# Altium PCB Baseboard-Development.PcbDoc (part 7 of 8)
Units mm, origin at the board's own origin, x right, y up, seen from the top; angles counter-clockwise.
Board outline 120 x 90 mm, 6 copper layers (Top Layer, SIGNAL-1, PWR, SIGNAL-2, GND-2, Bottom Layer), stack 1.705 mm thick; 417 components, 313 nets, 1500 pads, 606 vias.
Unrouted connection lines stored in the file: 357.
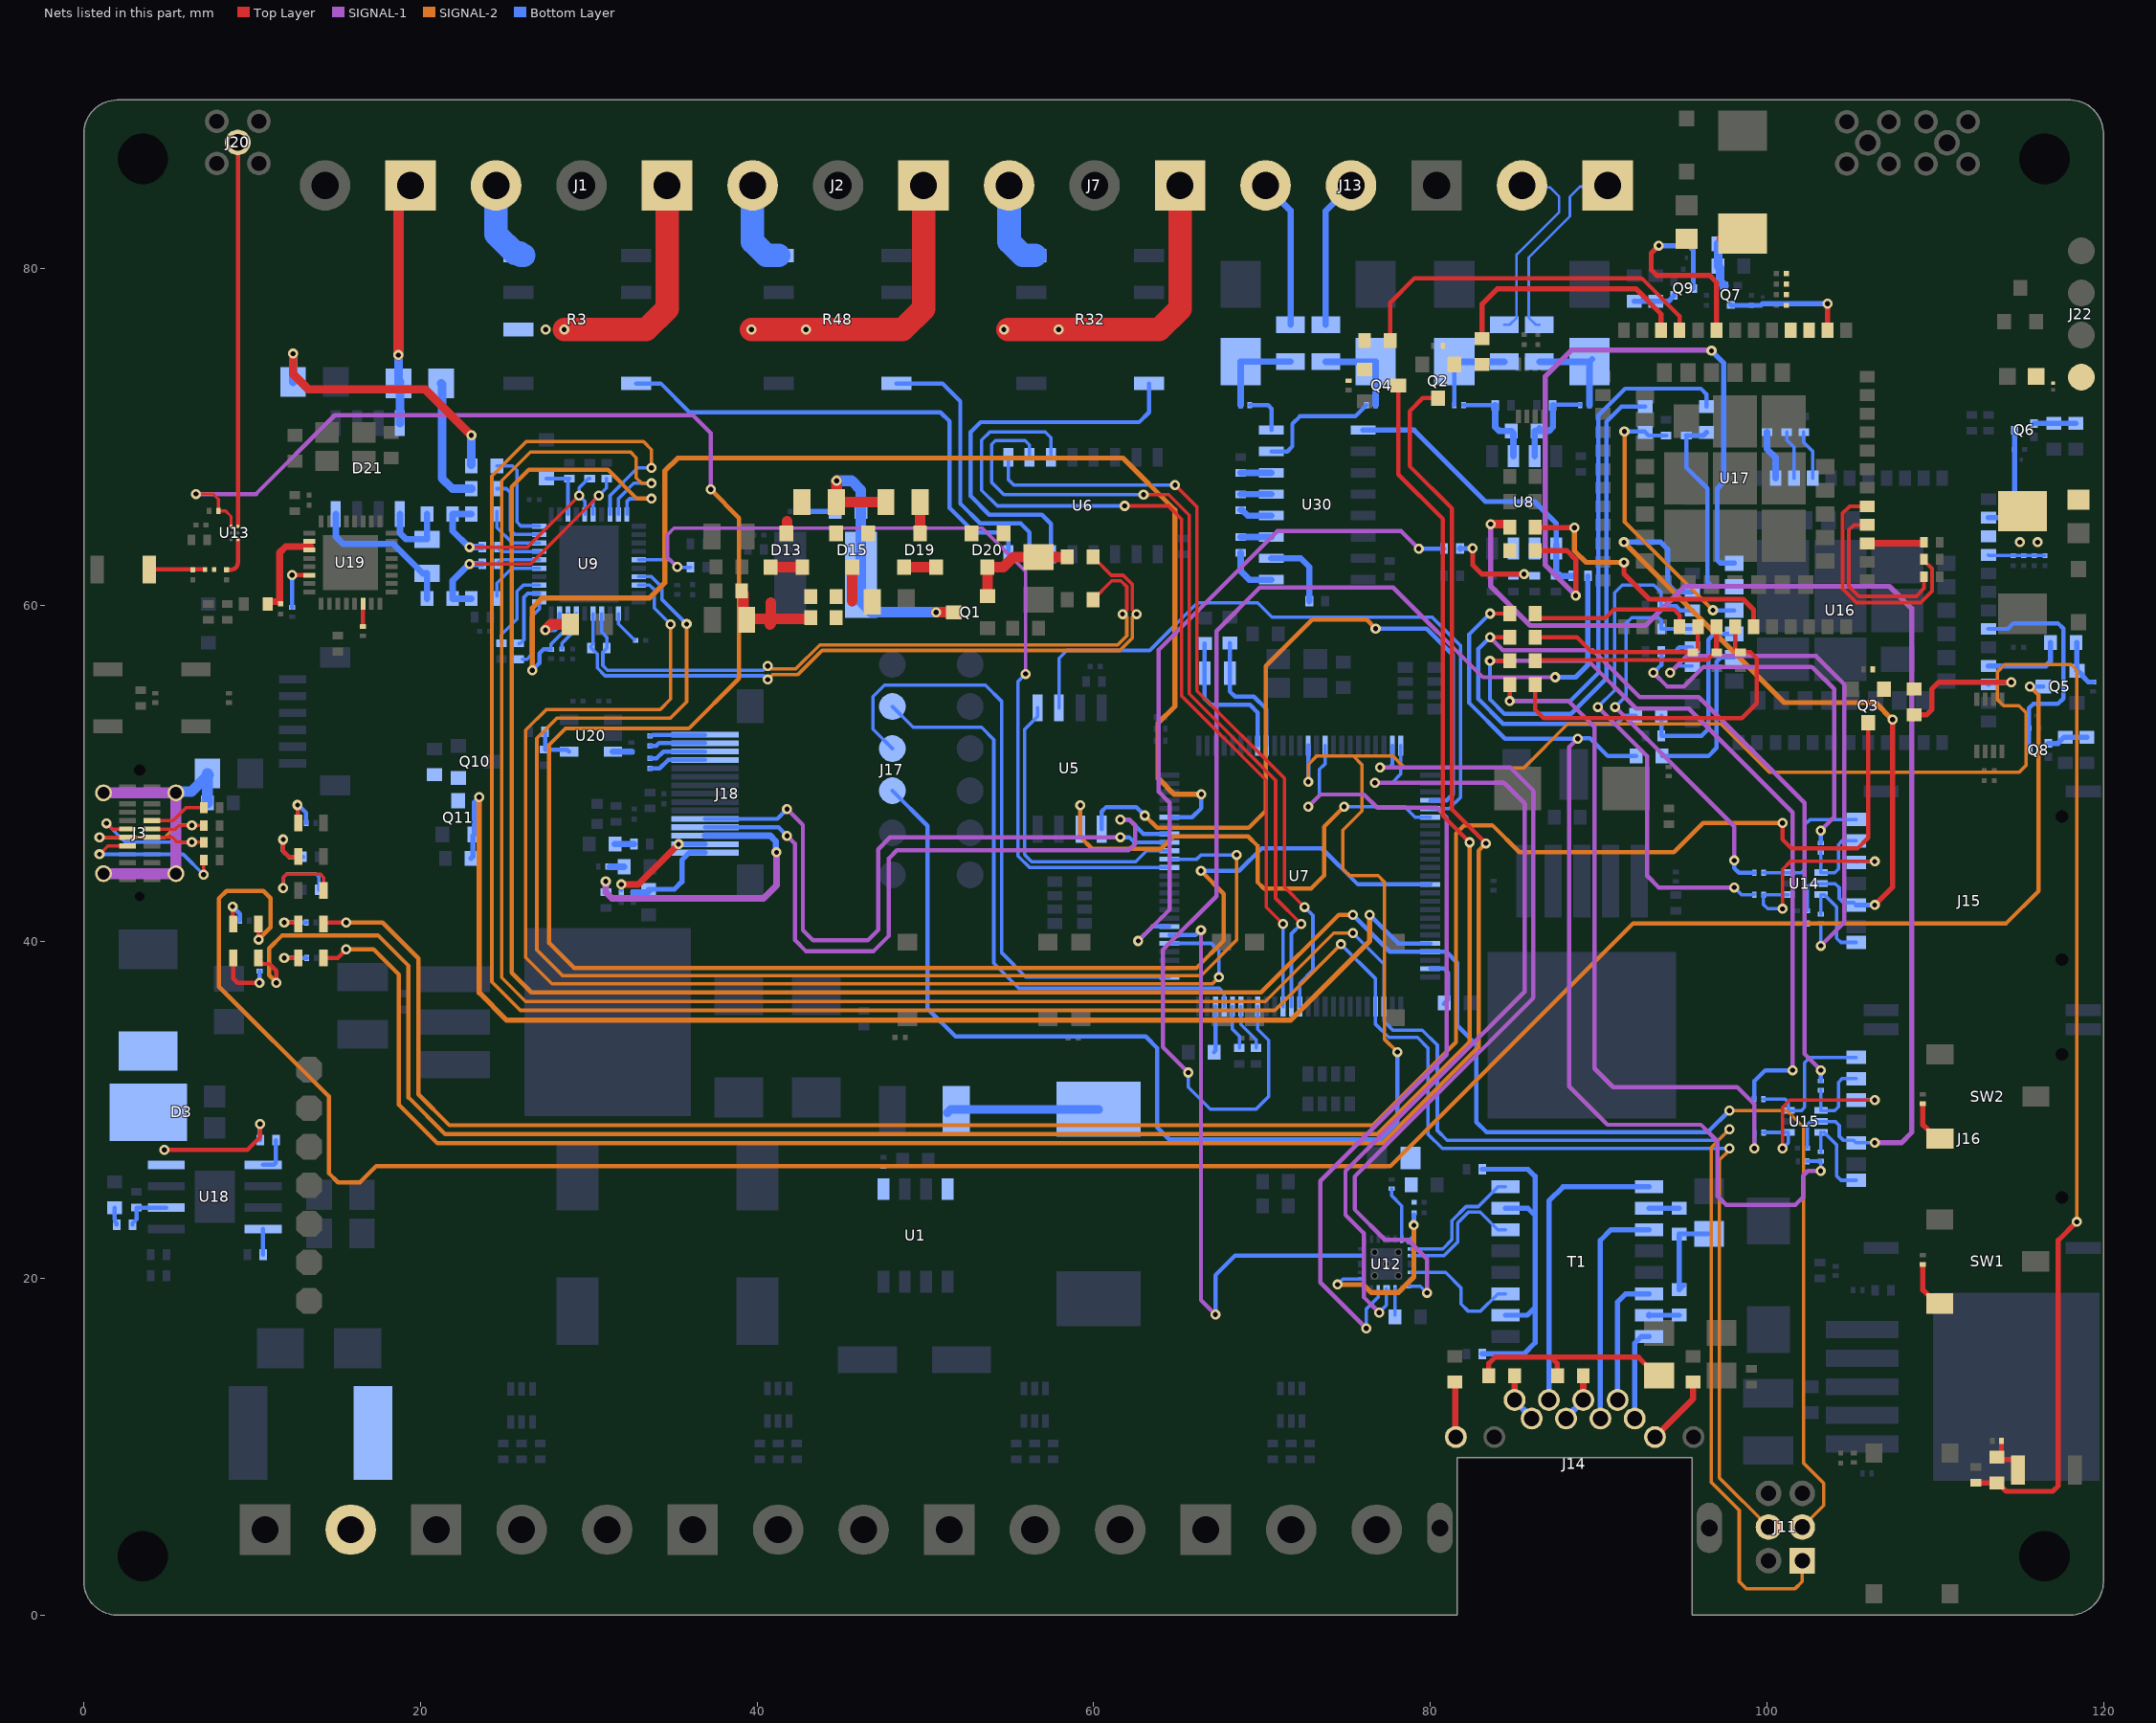
[diagram p8: the nets of this part, all layers, seen from the top]

## Via types
v1: diameter 0.6, hole 0.3, Top Layer to Bottom Layer, tented both sides, 606 vias

## Nets (pads, with @x,y where several pads share a name; then routed paths per layer and width w, separated by ;. In a path a pad name is that pad's centre, name@x,y a point inside that pad or via, vN(x,y) a via of type N, cw(c..) or ccw(c..) an arc to the next point about the centre after c; other vN are vias at no path point) (continued)
MDC: U7.16 U12.16 | length 50.2
  SIGNAL-1 w0.254: v1(72.749,48.013) 73.48,48.744 76.063,48.744 76.848,47.959 80.394,47.959 80.975,47.378 80.975,33.289 73.47,25.784 73.47,19.763 v1(76.195,17.038)
  Bottom Layer w0.203: v1(72.749,48.013) 73.421,48.685 73.421,50.237 73.749,50.565 U7.16@73.749,51.651 ; v1(76.195,17.038) 76.195,18.182 76.898,18.885 U12.16@76.898,19.256
MDIO: U7.25 U12.15 | length 49.9
  SIGNAL-1 w0.254: v1(76.709,49.442) 84.387,49.442 85.605,48.224 85.605,37.03 74.961,26.387 74.961,23.769 76.043,22.687 76.043,18.891 v1(76.96,17.975)
  Bottom Layer w0.203: v1(76.709,49.442) 77.725,49.442 78.249,49.966 U7.25@78.249,51.651 ; v1(76.96,17.975) 77.4,18.414 U12.15@77.4,19.38
NC_1: J1.1 R3.2 | length 13.9
  Top Layer w1.397: v1(28.544,76.362) 33.418,76.362 34.655,77.598 J1.1@34.655,84.92
  other v1: 27.441,76.362
NC_2: J2.1 R48.2 | length 18.1
  Top Layer w1.397: v1(39.664,76.362) v1(42.915,76.362) 48.658,76.362 49.895,77.598 J2.1@49.895,84.92
NC_3: J7.1 R32.2 | length 18.1
  Top Layer w1.397: v1@54.904,76.362 58.155,76.362 63.898,76.362 65.135,77.598 J7.1@65.135,84.92
  other v1: 54.669,76.362 57.921,76.362
NetANT1_1: ANT1.1 C107.2 L4.1 | length 3.3
  Top Layer w0.257: ANT1.1@3.881,62.098 3.881,62.109 L4.1@7.197,62.109
NetC3_2: C3.2 J18.14 | length 6.4
  Top Layer w0.381: v1(31.935,43.404) 32.944,43.404 34.245,44.705 v1(35.334,45.793)
  Bottom Layer w0.254: C3.2@31.935,43.064 v1(31.935,43.404) v1@31.935,43.531
  Bottom Layer w0.305: v1(35.334,45.793) J18.14@36.91,45.793
NetC4_2: C4.2 C5.2 J18.15 | length 6
  Bottom Layer w0.305: C4.2@33.561,43.114 35.091,43.114 35.537,43.561 35.537,44.847 35.984,45.293 J18.15@36.91,45.293
  Bottom Layer w0.381: C5.2@32.647,42.932 33.506,42.932 C4.2@33.625,43.051
NetC6_1: C6.1 J18.1 | length 3.3
  Bottom Layer w0.254: C6.1@33.637,52.23 33.66,52.253 33.771,52.253 33.809,52.29 J18.1@36.907,52.29
NetC6_2: C6.2 J18.2 | length 3.3
  Bottom Layer w0.254: C6.2@33.637,51.63 34.005,51.63 34.168,51.793 J18.2@36.91,51.793
NetC7_1: C7.1 J18.3 | length 3.4
  Bottom Layer w0.254: C7.1@33.637,50.885 34.028,50.885 34.436,51.293 J18.3@36.91,51.293
NetC7_2: C7.2 J18.4 | length 3.5
  Bottom Layer w0.254: C7.2@33.637,50.285 34.208,50.285 34.716,50.793 J18.4@36.91,50.793
NetC8_2: C8.2 J3.MP1 J3.MP2 J3.MP3 J3.MP4 R5.2 | length 17.5
  SIGNAL-1 w0.635: J3.MP3@1.172,44.042 J3.MP2@5.472,44.042 ; J3.MP4@1.172,48.842 J3.MP1@5.472,48.842 5.472,44.098 J3.MP2@5.481,44.089
  Bottom Layer w0.635: J3.MP1@5.472,48.842 5.542,48.912 6.389,48.912 C8.2@7.348,49.871 ; R5.2@7.348,48.237 C8.2@7.348,49.871 ; C8.2@7.348,49.998 C8.2@7.348,49.871 ; C8.2@7.412,49.906 7.383,49.906 C8.2@7.348,49.871
NetC17_1: C17.1 D3.2 L1.1 U18.8 | length 7.7
  Top Layer w0.254: v1(4.78,27.635) 9.722,27.635 10.477,28.391 v1(10.477,29.168)
  Bottom Layer w0.254: C17.1@10.477,28.216 v1(10.477,29.168)
NetC17_2: C17.2 U18.1 | length 2.2
  Bottom Layer w0.254: U18.1@10.655,26.746 11.294,26.746 11.417,26.869 C17.2@11.417,28.216
NetC21_2: C21.2 R8.2 U18.6 | length 2.9
  Bottom Layer w0.254: R8.2@2.895,23.186 2.895,23.275 3.124,23.504 C21.2@3.124,24.206 U18.6@4.905,24.206
NetC22_2: C22.2 R8.1 | length 1.1
  Bottom Layer w0.254: C22.2@1.829,24.206 1.829,23.525 1.854,23.5 1.854,23.377 1.956,23.275 R8.1@1.956,23.186
NetC25_2: C25.2 U7.49 | length 3.1
  Bottom Layer w0.254: U7.49@79.999,38.401 80.813,38.401 81.056,38.159 81.056,36.559 C25.2@80.81,36.313
NetC26_2: C26.2 U7.73 | length 2.8
  Bottom Layer w0.254: C26.2@67.147,33.437 67.249,33.538 U7.73@67.249,36.151
NetC42_1: C42.1 U30.4 | length 2
  Bottom Layer w0.381: C42.1@68.731,65.641 68.82,65.641 69.15,65.311 U30.4@70.559,65.311
NetC42_2: C42.2 U30.5 | length 1.8
  Bottom Layer w0.381: C42.2@68.731,66.581 U30.5@70.559,66.581
NetC43_1: C43.1 U30.1 | length 3.1
  Bottom Layer w0.381: C43.1@68.731,63.101 68.731,62.011 69.241,61.501 U30.1@70.559,61.501
NetC43_2: C43.2 U30.3 | length 1.8
  Bottom Layer w0.381: C43.2@68.731,64.041 U30.3@70.559,64.041
NetC44_2: C44.2 U30.6 | length 1.8
  Bottom Layer w0.381: C44.2@68.731,67.851 U30.6@70.559,67.851
NetC45_2: C45.2 U30.2 | length 4.5
  Bottom Layer w0.381: U30.2@70.559,62.771 72.306,62.771 72.814,62.263 C45.2@72.814,60.231
NetC49_2: C49.2 C76.2 C77.2 FB2.1 U12.6 U12.19 | length 11.5
  SIGNAL-2 w0.305: v1(74.493,19.636) 76.015,19.636 76.497,19.155 78.097,19.155 79.025,20.082 v1(79.025,23.16)
  Bottom Layer w0.203: v1(74.493,19.636) 74.811,19.955 U12.19@75.925,19.955
  Bottom Layer w0.305: U12.6@78.725,22.18 79.025,22.48 v1(79.025,23.16) C76.2@79.025,23.761
NetC53_1: C53.1 R29.2 | length 2.1
  Bottom Layer w0.305: C53.1@42.571,65.556 R29.2@44.647,65.556
NetC54_1: C54.1 D12.2 U9.33 | length 3.5
  Bottom Layer w0.203: D12.2@27.484,67.507 28.765,67.507 C54.1@28.857,67.507 28.765,67.415 U9.33@28.765,65.383
NetC55_1: C55.1 C56.1 C64.2 D15.3 D19.1 D19.2 | length 3.9
  Top Layer w0.635: 45.658,60.244 D15.3@45.658,62.251 ; D19.1@48.737,62.251 D19.2@50.637,62.251
NetC55_2: C55.2 C56.2 C58.2 D13.1 D13.2 R28.1 | length 9
  Top Layer w0.635: R28.1@39.086,60.842 39.086,60.779 39.193,60.671 39.193,59.312 C58.2@39.384,59.122 39.446,59.184 C56.2@43.122,59.184 ; 40.76,58.829 40.822,58.891 40.822,60.136 ; D13.1@40.797,62.251 D13.2@42.697,62.251 42.697,62.201 D13.2@42.789,62.109
NetC57_1: C57.1 C59.1 L3.1 Q1.3 R29.1 | length 18.3
  Top Layer w0.635: C57.1@44.708,66.122 44.724,66.137 v1(44.724,67.381) ; C57.1@44.708,66.122 C59.1@47.655,66.121 ; v1(50.637,59.567) Q1.3@51.69,59.567
  Bottom Layer w0.635: v1(44.724,67.381) 45.613,67.381 46.171,66.823 R29.1@46.171,65.556 L3.1@46.171,61.796 46.171,60.199 46.803,59.567 v1(50.637,59.567)
NetC57_2: C57.2 D13.3 D15.1 D15.2 | length 0.7
  Top Layer w0.635: D13.3@41.747,64.251 41.784,64.289 41.784,64.975
NetC59_2: C59.2 D19.3 D20.1 D20.2 | length 1.9
  Top Layer w0.635: D19.3@49.687,64.251 C59.2@49.687,66.121
NetC60_2: C60.2 U9.26 | length 2.6
  Bottom Layer w0.203: C60.2@24.613,62.412 24.613,62.501 24.795,62.683 U9.26@27.065,62.683
NetC61_2: C61.2 U9.27 | length 2.6
  Bottom Layer w0.203: C61.2@24.613,63.455 24.613,63.366 24.795,63.183 U9.27@27.065,63.183
NetC65_1: C65.1 U9.21 | length 4
  Bottom Layer w0.203: C65.1@26.043,56.775 26.044,56.776 26.343,56.776 26.581,57.014 26.581,59.286 27.065,59.771 U9.21@27.065,60.183
NetC65_2: C65.2 U9.22 | length 3.9
  Bottom Layer w0.203: C65.2@25.839,57.714 25.928,57.714 26.152,57.938 26.152,60.461 26.375,60.683 U9.22@27.065,60.683
NetC66_2: C66.2 U9.12 | length 2
  Bottom Layer w0.203: U9.12@31.765,59.483 31.766,59.482 31.766,58.885 32.71,57.941 32.742,57.941 C66.2@32.742,57.928
NetC68_2: C68.2 U9.17 | length 2.4
  Bottom Layer w0.203: C68.2@28.415,57.39 28.415,57.725 29.265,58.575 U9.17@29.265,59.483
NetC69_1: C69.1 D21.5 R67.1 | length 4.4
  Bottom Layer w0.381: D21.5@18.785,65.405 18.785,64.271 19.15,63.906 C69.1@20.391,63.906 R67.1@20.391,65.405
NetC69_2: C69.2 D21.8 R66.1 | length 9.2
  Bottom Layer w0.381: D21.8@14.975,65.405 14.976,65.404 14.976,64.058 15.41,63.624 18.388,63.624 20.137,61.874 C69.2@20.391,61.874 R66.1@20.391,60.376
NetC78_2: C78.2 C79.2 T1.2 T1.7 | length 20.5
  Bottom Layer w0.305: C78.2@83.087,15.519 85.569,15.519 86.228,16.178 86.228,18.283 ; C79.2@83.087,26.487 85.805,26.487 86.228,26.064 86.228,23.744 ; T1.2@84.466,17.817 85.762,17.817 86.228,18.283 ; T1.7@84.466,24.167 85.805,24.167 86.228,23.744 ; 86.228,18.283 86.228,23.744
NetC90_2: C90.2 C91.2 C92.2 C93.2 C94.1 FB4.1 U17.34 U17.35 | length 1
  Top Layer w0.508: C94.1@97.289,81.777 97.855,82.344 97.855,82.216 C94.1@97.904,82.168
NetC95_2: C95.2 C96.2 C97.2 C98.2 C99.1 FB3.1 U16.34 U16.35 | length 3.4
  Bottom Layer w0.203: U16.35@113.164,62.981 113.211,62.934 C95.2@114.626,62.934 C96.2@115.257,62.934 C97.2@115.887,62.934 C98.2@116.518,62.934
  other v1: 115.028,63.731 116.09,63.731
NetC108_2: C108.2 L4.2 U13.A3 | length 2.3
  Top Layer w0.257: C108.2@8.477,62.098 8.736,62.098 ccw(c8.736,62.513) 9.152,62.513 U13.A3@9.152,63.874
NetC109_2: C109.2 R88.1 R89.1 | length 5.4
  Bottom Layer w0.305: R88.1@95.046,19.594 R88.1@94.793,19.341 R89.1@94.793,22.643 C109.2@96.571,22.643
NetC113_2: C113.2 SB4.1 U17.15 | length 11.4
  Top Layer w0.254: SB4.1@86.241,58.085 88.716,58.085 89.613,57.189 C113.2@95.608,57.189 95.697,57.189 95.908,57.399 U17.15@95.908,58.712
NetC115_2: C115.2 SB6.1 U17.17 | length 20.7
  Top Layer w0.254: SB6.1@86.241,55.275 86.241,53.779 86.744,53.276 98.511,53.276 99.401,54.166 99.401,56.823 99.036,57.189 98.339,57.189 98.108,57.42 U17.17@98.108,58.712
NetC118_2: C118.2 SB8.1 U17.16 | length 12.5
  Top Layer w0.254: SB8.1@86.241,56.68 86.292,56.731 96.468,56.731 96.925,57.189 C118.2@97.014,57.189
  Top Layer w0.305: U17.16@97.008,58.712 97.011,58.709 97.011,57.191 C118.2@97.014,57.189
NetC119_2: C119.2 SB15.1 U16.54 | length 16.6
  SIGNAL-2 w0.254: v1(91.536,70.302) 91.536,64.945 v1(96.794,59.688)
  Bottom Layer w0.254: v1(91.536,70.302) 92.734,70.302 92.97,70.066 C119.2@94.009,70.066 ; v1(96.794,59.688) 98.058,59.688 U16.54@98.064,59.681
NetC120_2: C120.2 SB13.1 U16.55 | length 12.2
  Bottom Layer w0.254: C120.2@95.219,70.066 95.219,68.162 96.461,66.921 96.461,61.373 96.753,61.081 U16.55@98.064,61.081
  Bottom Layer w0.305: C120.2@95.219,70.066 96.226,70.066 SB13.1@96.416,70.256
NetC121_2: C121.2 SB11.1 U16.53 | length 11.2
  Bottom Layer w0.254: SB11.1@93.725,53.431 C121.2@93.725,52.231 96.115,52.231 96.519,52.635 96.519,57.945 96.855,58.281 U16.53@98.064,58.281
NetC126_1: C126.1 L5.1 U19.2 U19.3 | length 5.3
  Top Layer w0.406: 11.227,60.191 11.563,60.191 11.635,60.263 11.635,63.111 11.987,63.464 13.392,63.464 13.491,63.464
NetC132_2: C132.2 R86.1 R87.1 | length 12.7
  Top Layer w0.305: R86.1@83.484,14.224 83.484,14.958 83.852,15.325 87.162,15.325 ; R87.1@87.564,14.224 87.54,14.248 87.54,14.947 87.162,15.325 ; C132.2@93.599,14.224 93.472,14.224 92.37,15.325 87.162,15.325
NetD7_1: D7.1 L2.1 U1.8 | length 9
  Bottom Layer w0.508: D7.1@51.316,29.85 51.488,30.023 51.514,30.048 L2.1@60.282,30.048
NetD14_2: D14.2 F3.2 J22.1
NetD20_3: D20.3 Q1.2 R57.2 R60.2 | length 6.7
  Top Layer w0.635: Q1.2@53.69,60.517 D20.3@53.69,62.251 ; D20.3@53.69,62.251 54.64,62.251 55.239,62.851 R57.2@58.436,62.851
NetD40_2: D40.2 F20.1 R74.2 | length 5.8
  Bottom Layer w0.381: F20.1@86.485,74.447 89.39,74.447 D40.2@89.441,74.397 ; R74.2@89.457,71.864 89.457,74.438 D40.2@89.619,74.6
NetD41_2: D41.2 F21.1 R75.2 | length 5.6
  Bottom Layer w0.254: R75.2@81.431,71.864 81.431,74.447 D41.2@81.431,74.452
  Bottom Layer w0.381: D41.2@81.431,74.447 F21.1@84.402,74.447
NetD42_2: D42.2 F19.2 R73.1 | length 5.6
  Bottom Layer w0.381: R73.1@68.731,71.864 D42.2@68.731,74.452 F19.2@71.702,74.452
NetD43_2: D43.2 F22.2 R76.1 | length 5.6
  Bottom Layer w0.381: F22.2@73.785,74.447 76.752,74.447 D43.2@76.757,74.452 R76.1@76.757,71.864
NetF2_1: F2.1 J5.2
NetJ3_A5: J3.A5 R4.1 | length 3.4
  Top Layer w0.203: J3.A5@4.042,47.192 5.307,47.192 6.081,47.966 R4.1@7.12,47.966
NetJ3_A6: J3.A6 J3.B6 R64.2 | length 10.6
  Top Layer w0.203: v1@0.94,46.192 J3.B6@2.602,46.192 ; J3.A6@4.042,46.692 5.443,46.692 5.659,46.909 v1(6.421,46.909) 7.031,46.909 R64.2@7.081,46.858
  SIGNAL-2 w0.203: v1@0.96,46.197 4.821,46.197 5.532,46.909 v1(6.421,46.909)
  other v1: 0.935,46.197
NetJ3_A7: J3.A7 J3.B7 R63.2 | length 10.1
  Top Layer w0.203: v1(1.341,47.036) 1.684,46.692 J3.B7@2.602,46.692 ; J3.A7@4.042,46.192 5.268,46.192 5.542,45.918 v1(6.421,45.918) 6.425,45.914 7.105,45.914 R63.2@7.12,45.9
  Bottom Layer w0.203: v1(1.341,47.036) 2.459,45.918 v1(6.421,45.918)
NetJ3_B5: J3.B5 R6.1 | length 9.4
  Top Layer w0.203: v1(0.935,45.192) 1.435,45.692 J3.B5@2.602,45.692 ; v1(7.12,43.978) R6.1@7.12,44.842
  Bottom Layer w0.203: v1(0.935,45.192) 5.906,45.192 v1(7.12,43.978)
NetJ14_1: J14.1 T1.16 | length 5.5
  Bottom Layer w0.305: J14.1@92.148,11.682 92.148,16.154 92.541,16.547 T1.16@92.996,16.547
NetJ14_2: J14.2 T1.14 | length 7.9
  Bottom Layer w0.305: J14.2@91.128,12.782 91.128,18.604 91.612,19.087 T1.14@92.996,19.087
NetJ14_3: J14.3 T1.11 | length 13.7
  Bottom Layer w0.305: J14.3@90.108,11.682 90.108,22.263 90.742,22.897 T1.11@92.996,22.897
NetJ14_4: J14.4 J14.5 R87.2 | length 3
  Top Layer w0.381: J14.4@89.088,12.782 R87.2@89.088,14.224
  Bottom Layer w0.381: J14.5@88.068,11.682 88.068,11.722 89.088,12.742 J14.4@89.088,12.782
NetJ14_6: J14.6 T1.9 | length 18.1
  Bottom Layer w0.305: J14.6@87.048,12.782 87.048,24.601 87.885,25.437 T1.9@92.996,25.437
NetJ14_7: J14.7 J14.8 R86.2 | length 3
  Top Layer w0.381: J14.8@85.008,12.782 R86.2@85.008,14.224
  Bottom Layer w0.381: J14.8@85.008,12.782 85.008,12.742 86.028,11.722 J14.7@86.028,11.682
NetJ14_10: J14.10 R84.2 | length 4.2
  Top Layer w0.381: J14.10@93.348,10.582 95.613,12.846 R84.2@95.613,13.843
NetJ14_12: J14.12 R85.2 | length 3.3
  Top Layer w0.381: R85.2@81.467,13.843 81.492,13.817 81.492,10.608 J14.12@81.518,10.582
NetJ18_13: J18.13 R121.2 | length 18.9
  SIGNAL-1 w0.381: v1(31.01,43.581) 31.01,42.938 31.373,42.576 40.391,42.576 41.156,43.341 v1(41.156,45.308)
  Bottom Layer w0.254: v1(31.01,43.581) 31.016,43.576 31.016,42.957 R121.2@31.021,42.952
  Bottom Layer w0.381: J18.13@36.91,46.293 40.786,46.293 41.115,45.965 41.115,45.35 v1(41.156,45.308)
NetJ20_1: J20.1 U13.A1 | length 22.8
  Top Layer w0.257: U13.A1@9.152,64.674 J20.1@9.152,87.478
NetLED1_1: LED1.1 R10.2 | length 2.4
  Top Layer w0.254: v1(12.699,48.119) 12.722,48.097 12.722,47.083 LED1.1@12.745,47.06
  Bottom Layer w0.254: v1(12.699,48.119) 12.745,48.119 13.212,47.652 13.212,47.068 R10.2@13.22,47.06
NetLED4_1: LED4.1 R100.1 | length 2.1
  Top Layer w0.254: v1(8.842,42.085) 8.842,41.083 LED4.1@8.879,41.046
  Bottom Layer w0.254: v1(8.842,42.085) 9.283,41.645 R100.1@9.283,41.262
NetLED4_2: LED4.2 Q5.3 | length 148.3
  Top Layer w0.254: v1(10.379,40.127) LED4.2@10.379,41.046
  SIGNAL-2 w0.254: v1(10.379,40.127) 11.1,40.847 11.1,42.59 10.669,43.022 8.484,43.022 8.034,42.572 8.034,37.332 14.554,30.813 14.554,26.252 15.106,25.7 16.403,25.7 17.368,26.665 77.631,26.665 92.058,41.092 114.219,41.092 116.149,43.022 116.149,54.633 v1(115.634,55.148)
  Bottom Layer w0.254: v1(115.634,55.148) Q5.3@116.422,55.148
NetLED5_1: LED5.1 R91.1 | length 2.2
  Top Layer w0.254: v1(11.907,41.138) 12.652,41.138 LED5.1@12.745,41.046
  Bottom Layer w0.254: v1(11.907,41.138) R91.1@13.22,41.138
NetLED5_2: LED5.2 Q3.3 | length 125.8
  Top Layer w0.254: LED5.2@14.245,41.138 v1(15.59,41.138) ; v1(100.93,47.054) 100.93,46.075 101.468,45.537 105.379,45.537 106.013,46.171 Q3.3@106.013,53.004
  SIGNAL-2 w0.254: v1(15.59,41.138) 17.754,41.138 19.887,39.005 19.887,30.933 21.72,29.1 76.595,29.1 81.528,34.032 81.528,46.431 82.019,46.922 83.685,46.922 85.296,45.31 94.474,45.31 96.218,47.054 v1(100.93,47.054)
NetLED6_1: LED6.1 R90.1 | length 2.2
  Top Layer w0.254: v1(11.907,39.041) LED6.1@12.745,39.041
  Bottom Layer w0.254: v1(11.907,39.041) R90.1@13.245,39.041
NetLED6_2: LED6.2 Q2.3 | length 122.3
  Top Layer w0.254: LED6.2@14.27,39.041 15.09,39.041 v1(15.59,39.541) ; Q2.3@80.467,72.288 79.555,72.288 78.776,71.509 78.776,68.249 81.295,65.73 81.295,47.853 v1(83.307,45.842)
  SIGNAL-2 w0.254: v1(15.59,39.541) 17.22,39.541 18.728,38.034 18.728,30.307 21.007,28.027 77.15,28.027 82.883,33.76 82.883,45.415 83.307,45.838 v1(83.307,45.842)
NetLED7_1: LED7.1 R99.1 | length 3.6
  Top Layer w0.254: LED7.1@8.879,39.041 8.879,37.811 9.129,37.561 v1(10.434,37.561)
  Bottom Layer w0.254: v1(10.434,37.561) R99.1@10.434,38.247
NetLED7_2: LED7.2 Q4.3 | length 128.6
  Top Layer w0.254: LED7.2@10.385,39.041 10.385,38.797 10.502,38.68 11.039,38.68 11.444,38.275 v1(11.444,37.561) ; Q4.3@78.1,73.039 78.1,67.757 80.74,65.116 80.74,47.494 v1(82.333,45.901)
  SIGNAL-2 w0.254: v1(11.444,37.561) 11.444,37.58 11.004,38.019 11.004,39.598 11.79,40.384 17.479,40.384 19.296,38.567 19.296,30.745 21.48,28.561 76.854,28.561 82.333,34.041 v1(82.333,45.901)
NetLED8_2: LED8.2 R125.2 | length 7.6
  Top Layer w0.203: v1(11.844,43.184) 11.844,43.8 12.065,44.02 14.042,44.02 14.245,43.818 LED8.2@14.245,43.083
  Bottom Layer w0.203: v1(11.844,43.184) 11.844,43.8 12.065,44.02 13.8,44.02 13.965,43.855 R125.2@13.965,43.083
NetLED9_1: LED9.1 R105.2 | length 3.7
  Top Layer w0.254: v1(11.844,46.07) 11.844,45.376 12.174,45.046 LED9.1@12.745,45.046
  Bottom Layer w0.254: v1(11.844,46.07) 11.844,45.372 12.17,45.046 R105.2@13.025,45.046
NETLIGHT: R102.1 U16.41 | length 4.9
  Bottom Layer w0.305: U16.41@113.164,56.381 116.581,56.381 116.847,56.647 R102.1@116.847,57.764
NETLIGHT_2: R101.1 U17.41 | length 21.8
  Top Layer w0.254: R101.1@77.624,75.706 77.624,77.959 79.077,79.413 92.553,79.413 94.808,77.158 U17.41@94.808,76.312
NetQ2_1: Q2.1 R92.2 R97.2
NetQ3_1: Q3.1 R93.2 R98.2
NetQ4_1: Q4.1 R101.2 R103.2
NetQ5_1: Q5.1 R102.2 R104.2 | length 2.9
  Bottom Layer w0.305: R102.2@118.422,57.764 Q5.1@118.422,56.098 118.472,56.098 118.729,55.841 118.729,55.791 119.097,55.423 R104.2@119.384,55.423
NetQ6_1: Q6.1 R107.1 R108.2 | length 2.5
  Bottom Layer w0.305: Q6.1@115.871,70.783 R108.2@117.04,70.783 R107.1@118.36,70.783
NetQ7_1: Q7.1 R109.1 R110.2 | length 2.6
  Bottom Layer w0.508: R109.1@97.091,81.455 97.098,81.449 97.098,80.133 R110.2@97.104,80.127 97.231,80 97.231,79.21 Q7.1@97.466,78.975
NetQ8_1: Q8.1 R113.1 R114.2 | length 2.5
  Bottom Layer w0.305: Q8.1@116.715,51.781 117.298,51.781 117.66,52.143 R114.2@117.724,52.143 R113.1@119.019,52.143
NetQ9_1: Q9.1 R115.1 R116.2 | length 2.5
  Bottom Layer w0.305: R115.1@92.127,78.035 94.141,78.035 94.478,78.372 Q9.1@94.478,78.397
NetQ10_1: Q10.1 Q11.3 R1.2
NetR15_2: R15.2 U18.4 | length 1.5
  Bottom Layer w0.254: R15.2@10.655,21.409 U18.4@10.655,22.936
NetR16_1: R16.1 SW1.3 | length 2.8
  Top Layer w0.305: R16.1@109.266,20.827 109.266,19.309 110.066,18.509 SW1.3@110.266,18.509
NetR17_1: R17.1 SW2.3 | length 2.6
  Top Layer w0.305: R17.1@109.266,30.382 109.266,29.119 110.081,28.303 SW2.3@110.281,28.303
NetR18_1: R18.1 U1.5
NetR20_2: R20.2 U7.70 | length 2.8
  Bottom Layer w0.203: U7.70@68.749,36.151 68.749,35.082 69.653,34.178 R20.2@69.653,33.691
NetR25_2: R25.2 U7.71 | length 2.6
  Bottom Layer w0.203: U7.71@68.249,36.151 68.249,34.797 68.653,34.393 R25.2@68.653,33.691
NetR31_1: R31.1 U9.30 | length 5.8
  Bottom Layer w0.203: R31.1@24.549,68.264 25.473,68.264 25.729,68.008 25.729,64.926 25.965,64.691 27.058,64.691 U9.30@27.065,64.683
NetR33_1: R33.1 U9.29 | length 5
  Bottom Layer w0.203: R33.1@24.549,66.911 25.121,66.911 25.33,66.701 25.33,64.461 25.608,64.183 U9.29@27.065,64.183
NetR34_1: R34.1 R49.2 SW3.1 | length 2.9
  Top Layer w0.305: R34.1@113.94,10.338 113.94,9.606 113.711,9.378 R49.2@113.665,9.378 113.81,9.233 114.654,9.233 114.912,8.975 SW3.1@114.912,8.616
NetR47_1: R47.1 U9.28 | length 3.9
  Bottom Layer w0.203: R47.1@24.549,65.559 24.549,64.6 25.466,63.683 U9.28@27.065,63.683
NetR50_2: R50.2 U16.26 | length 3
  Bottom Layer w0.203: R50.2@102.192,70.272 102.192,69.653 102.714,69.131 U16.26@102.714,67.531
NetR51_2: R51.2 U12.5 | length 3.2
  Bottom Layer w0.203: R51.2@77.696,25.329 77.696,24.918 78.3,24.314 U12.5@78.3,22.33
NetR53_1: R53.1 U9.25 | length 3.7
  Bottom Layer w0.203: R53.1@24.549,60.533 24.549,61.303 25.43,62.183 U9.25@27.065,62.183
NetR54_2: R54.2 U9.23 | length 4.9
  Bottom Layer w0.203: R54.2@24.806,57.73 24.806,58.23 25.74,59.163 25.74,60.805 26.118,61.183 U9.23@27.065,61.183
NetR55_2: R55.2 U12.14 | length 1.6
  Bottom Layer w0.203: R55.2@77.9,17.817 U12.14@77.9,19.38
NetR72_1: R72.1 R74.1 R78.1 U8.7 | length 5.7
  Bottom Layer w0.254: R72.1@87.273,71.888 R74.1@88.907,71.888
  Bottom Layer w0.381: U8.7@86.206,68.848 R78.1@86.206,70.34 ; R78.1@86.488,70.495 R78.1@86.333,70.34 87.062,70.34 87.286,70.563 R72.1@87.286,71.864
NetR73_2: R73.2 U30.8 | length 2.6
  Bottom Layer w0.254: R73.2@69.281,71.864 70.374,71.864 70.559,71.679 U30.8@70.559,70.391
NetR75_1: R75.1 R77.2 R78.2 U8.6 | length 5.8
  Bottom Layer w0.254: R75.1@81.981,71.864 R77.2@83.856,71.864
  Bottom Layer w0.381: R77.2@83.856,71.864 83.856,70.563 84.079,70.34 R78.2@84.809,70.34 84.936,70.213 U8.6@84.936,68.848
NetR76_2: R76.2 U30.7 | length 7.6
  Bottom Layer w0.254: U30.7@70.559,69.121 71.501,69.121 71.806,69.426 71.806,70.757 72.256,71.207 75.55,71.207 R76.2@76.207,71.864
NetR88_2: R88.2 T1.15 | length 1.8
  Bottom Layer w0.305: T1.15@92.996,17.817 R88.2@94.793,17.817
NetR89_2: R89.2 T1.10 | length 1.8
  Bottom Layer w0.305: T1.10@92.996,24.167 R89.2@94.793,24.167
NetR118_2: R118.2 R119.1 | length 1.1
  Bottom Layer w0.381: R118.2@31.554,45.801 R119.1@32.697,45.801
NetR120_2: R120.2 SB17.2 | length 0.9
  Bottom Layer w0.381: 31.249,44.453 SB17.2@32.113,44.453
NetR131_2: R131.2 U19.6 | length 2.9
  Top Layer w0.254: v1(12.376,61.771) U19.6@13.392,61.771
  Bottom Layer w0.254: R131.2@12.376,59.858 v1(12.376,61.771)
NetR132_2: R132.2 U19.14 | length 1.4
  Top Layer w0.254: R132.2@16.592,58.719 U19.14@16.592,60.071
NetR134_2: R134.2 U17.26 | length 14.1
  Top Layer w0.229: U17.26@105.958,65.862 104.925,65.862 104.51,65.447 104.51,60.957 105.311,60.157 109.131,60.157 109.813,60.838 109.813,62.152 109.34,62.625 R134.2@109.34,62.714
NetR135_2: R135.2 U16.25 | length 2.9
  Bottom Layer w0.203: R135.2@101.18,70.272 101.18,69.799 101.614,69.364 U16.25@101.614,67.531
NetR136_2: R136.2 U17.25 | length 10.1
  Top Layer w0.229: U17.25@105.958,64.762 105.186,64.762 104.88,64.455 104.88,61.115 105.472,60.523 108.87,60.523 109.34,60.993 R136.2@109.34,61.683
NetR139_1: R139.1 U20.3 | length 1.1
  Bottom Layer w0.381: U20.3@31.441,51.28 R139.1@32.544,51.28
NetR140_1: R140.1 R141.1 U20.4 | length 2.5
  Bottom Layer w0.254: R140.1@27.407,52.471 R141.1@27.407,51.41 28.711,51.41 U20.4@28.841,51.28
NetR142_2: R142.2 U16.24 | length 3
  Bottom Layer w0.381: R142.2@100.008,70.272 100.008,69.253 100.514,68.747 U16.24@100.514,67.531
NetR143_2: R143.2 U17.24 | length 3.4
  Top Layer w0.381: U17.24@105.968,63.671 109.302,63.671 109.34,63.71 R143.2@109.34,63.731
NetSB2_1: SB2.1 U17.14 | length 9.7
  Top Layer w0.254: SB2.1@86.241,59.491 86.241,59.47 86.495,59.216 90.395,59.216 90.923,59.744 94.46,59.744 94.808,59.395 U17.14@94.808,58.712
NetSB9_1: SB9.1 U16.52 | length 9.7
  Bottom Layer w0.254: SB9.1@93.756,51.023 96.518,51.023 97.01,51.516 97.01,56.625 97.266,56.881 U16.52@98.064,56.881
NO_1: J1.3 R3.4 | length 5
  Bottom Layer w1.397: J1.3@24.495,84.92 24.495,82.028 25.626,80.896 R3.4@25.912,80.896 ; R3.4@25.96,80.766 25.965,80.761 R3.4@26.138,80.761
NO_2: J2.3 R48.4 | length 5.2
  Bottom Layer w1.397: J2.3@39.735,84.92 39.735,81.58 40.553,80.762 R48.4@41.289,80.762
NO_3: J7.3 R32.4 | length 5.2
  Bottom Layer w1.397: J7.3@54.975,84.92 54.975,81.58 55.793,80.762 R32.4@56.529,80.762
NRST: C24.2 J17.4 R49.1 U7.14 | length 187.7
  Top Layer w0.305: C24.2@112.42,7.854 113.728,7.854 114.226,7.356 116.986,7.356 117.304,7.674 117.304,22.257 v1(118.41,23.363)
  SIGNAL-2 w0.203: v1(72.749,49.499) 72.749,50.517 73.255,51.023 75.424,51.023 ; v1(78.04,33.448) 77.267,34.221 77.267,43.558 76.905,43.919 75.216,43.919 74.805,44.33 74.805,46.631 75.937,47.762 75.937,50.511 75.424,51.023 ; v1(118.41,23.363) 118.41,56.13 118.072,56.467 114.121,56.467 113.707,56.053 113.707,54.372 114.058,54.021 114.981,54.021 115.39,53.611 115.39,50.462 114.99,50.062 100.134,50.062 97.268,52.928 88.16,52.928 85.544,50.312 78.486,50.312 77.775,51.023 75.424,51.023
  Bottom Layer w0.254: J17.4@48.039,48.971 50.132,46.878 50.132,36.027 51.791,34.368 63.09,34.368 63.777,33.68 63.777,28.977 64.494,28.26 77.132,28.26 78.04,29.168 v1(78.04,33.448) ; v1(72.749,49.499) U7.14@72.749,51.651
OLED_ON/OFF: Q11.1 R2.2 U7.46 | length 76.9
  SIGNAL-2 w0.305: v1(23.496,48.593) 23.496,36.969 25.131,35.334 71.686,35.334 76.399,40.047 v1(76.399,41.6)
  Bottom Layer w0.254: v1(76.399,41.6) 78.098,39.901 U7.46@79.999,39.901
  Bottom Layer w0.305: R2.2@23.01,44.958 23.118,45.067 23.118,45.759 ; 23.118,45.672 23.118,46.285 23.205,46.371 23.205,48.271 23.496,48.563 v1(23.496,48.593)
OSC_IN: C29.2 U7.8 X3.1 | length 8.7
  Bottom Layer w0.254: C29.2@66.599,57.706 X3.1@66.599,55.941 66.599,54.441 66.974,54.066 69.29,54.066 69.749,53.607 U7.8@69.749,51.651
OSC_OUT: C30.2 U7.9 X3.2 | length 7.6
  Bottom Layer w0.254: C30.2@68.097,57.744 68.099,57.742 68.099,54.861 68.406,54.553 69.523,54.553 70.249,53.827 U7.9@70.249,51.651
PCLK: C63.2 U7.89 U9.5 | length 54.3
  SIGNAL-1 w0.203: v1@35.254,62.257 34.679,62.832 34.679,64.173 35.068,64.562 53.386,64.562 55.952,61.995 v1(55.952,55.906)
  Bottom Layer w0.203: U9.5@32.965,62.683 34.821,62.683 35.261,62.243 C63.2@36.044,62.243 ; v1(55.952,55.906) 55.503,55.457 55.503,45.096 56.198,44.401 U7.89@64.499,44.401
  other v1: 35.261,62.264
PCM_MISO: U7.90 U9.7 | length 83.7
  SIGNAL-2 w0.203: v1(35.815,58.868) 35.815,54.252 34.832,53.269 28.096,53.269 26.919,52.092 26.919,39.517 28.449,37.987 66.388,37.987 68.498,40.097 v1@68.498,45.158
  Bottom Layer w0.203: U9.7@32.965,61.683 33.729,61.683 34.34,61.072 34.34,60.342 v1(35.815,58.868) ; U7.90@64.499,44.901 66.123,44.902 66.377,45.156 v1(68.499,45.156)
PCM_MOSI: U7.80 U9.8 | length 77.5
  SIGNAL-2 w0.203: v1(34.861,58.847) 34.861,54.41 34.247,53.797 27.483,53.797 26.258,52.573 26.258,39.06 27.813,37.505 67.06,37.505 v1(67.443,37.888)
  Bottom Layer w0.203: U9.8@32.965,61.183 33.617,61.183 33.893,60.907 33.893,59.814 v1(34.861,58.847) ; U7.80@64.499,39.901 66.981,39.901 67.443,39.439 v1(67.443,37.888)
PWRKEY: C88.2 D17.1 Q8.3 U16.39 | length 13.6
  Bottom Layer w0.254: U16.39@113.164,58.581 114.316,58.581 114.652,58.917 117.29,58.917 117.61,58.598 117.61,54.452 117.279,54.122 115.819,54.122 115.565,53.868 D17.1@115.565,53.431 ; D17.1@115.56,53.431 115.56,52.681 115.56,51.386 Q8.3@115.565,51.381
PWRKEY_2: C89.2 D23.1 Q9.3 U17.39 | length 13.1
  Top Layer w0.305: v1(93.576,81.347) 93.125,80.896 93.125,79.914 93.455,79.584 96.583,79.584 97.008,79.16 U17.39@97.008,76.312
  Bottom Layer w0.305: v1(93.576,81.347) 95.353,81.347 95.628,81.072 C89.2@95.628,79.94 Q9.3@95.628,78.797
RD_N: T1.8 U12.7 | length 7.8
  Bottom Layer w0.203: U12.7@78.875,21.755 80.749,21.755 81.295,22.301 81.295,23.435 82.129,24.269 82.843,24.269 84.011,25.437 T1.8@84.466,25.437
RD_P: T1.6 U12.8 | length 7.8
  Bottom Layer w0.203: U12.8@78.875,21.355 80.816,21.355 81.626,22.164 81.626,23.298 82.266,23.938 82.97,23.938 84.011,22.897 T1.6@84.466,22.897
RE/DE/RS485: R81.2 U7.82 | length 40.9
  SIGNAL-1 w0.254: v1(62.645,40.046) 64.524,41.924 64.524,48.242 63.869,48.897 63.869,57.346 70.908,64.384 78.28,64.384 v1(79.316,63.348)
  Bottom Layer w0.254: v1(62.645,40.046) 63.501,40.901 U7.82@64.499,40.901 ; v1(79.316,63.348) R81.2@80.83,63.348
RE/DE/RS485/T: R69.1 R70.1 R81.1 U8.2 U8.3 | length 5
  Top Layer w0.305: v1(82.519,63.368) 82.519,62.377 83.062,61.834 v1(85.571,61.834)
  Bottom Layer w0.305: R81.1@81.78,63.358 v1@82.51,63.358
  Bottom Layer w0.381: R81.1@81.77,63.348 R81.1@81.78,63.358 ; v1@82.51,63.358 v1(82.519,63.368)
REF_CLK: U7.24 U12.12 | length 49.7
  SIGNAL-1 w0.254: v1(77.01,50.349) 84.741,50.349 86.13,48.959 86.13,36.666 75.503,26.039 75.503,24.099 77.311,22.29 78.668,22.29 79.802,21.157 v1(79.802,19.146)
  Bottom Layer w0.203: v1(77.01,50.349) 77.567,50.349 77.749,50.531 U7.24@77.749,51.651 ; U12.12@78.725,19.53 79.418,19.53 v1(79.802,19.146)
RELAY_1: U6.1 U7.63 | length 46
  Top Layer w0.203: v1(64.837,67.127) 66.136,65.828 66.136,54.904 71.333,49.707 71.333,43.261 v1(72.537,42.057)
  Bottom Layer w0.203: U6.1@54.924,68.763 54.924,67.464 55.26,67.127 v1(64.837,67.127) ; U7.63@72.249,36.151 72.249,37.533 73.029,38.312 73.029,41.566 v1(72.537,42.057)
RELAY_2: U6.2 U7.64 | length 50.2
  Top Layer w0.203: v1(62.964,66.548) 64.461,66.548 65.675,65.334 65.675,54.725 70.81,49.59 70.81,42.571 v1(72.329,41.052)
  Bottom Layer w0.203: U6.2@56.194,68.763 56.192,68.764 56.192,69.52 55.937,69.775 54.161,69.775 53.932,69.545 53.932,67.282 54.666,66.548 v1(62.964,66.548) ; U7.64@71.749,36.151 71.749,40.472 v1(72.329,41.052)
RELAY_3: U6.3 U7.65 | length 52.6
  Top Layer w0.203: v1(61.848,65.888) 64.433,65.888 65.214,65.106 65.214,54.619 70.251,49.582 70.251,42.05 v1(71.249,41.052)
  Bottom Layer w0.203: U6.3@57.464,68.763 57.464,69.93 57.114,70.28 53.835,70.28 53.348,69.792 53.348,66.816 54.276,65.888 v1(61.848,65.888) ; U7.65@71.249,36.151 v1(71.249,41.052)
RET_K1: R3.8 U6.16 | length 29.9
  Bottom Layer w0.254: R3.8@32.815,73.162 34.275,73.162 35.987,71.451 50.895,71.451 51.448,70.898 51.448,65.766 52.902,64.312 54.57,64.312 54.924,63.958 U6.16@54.924,63.013
RET_K2: R48.8 U6.15 | length 16.4
  Bottom Layer w0.254: R48.8@48.289,73.162 51.008,73.162 52.077,72.093 52.077,66.027 53.262,64.842 55.663,64.842 56.194,64.311 U6.15@56.194,63.013
RET_K3: R32.8 U6.14 | length 23.9
  Bottom Layer w0.254: U6.14@57.464,63.013 57.464,64.819 56.923,65.36 53.799,65.36 52.698,66.461 52.698,70.28 53.279,70.861 62.707,70.861 63.295,71.448 R32.8@63.295,73.162
RF_SW: R122.2 U7.39 U13.B1 | length 137.7
  Top Layer w0.178: v1(6.668,66.594) 7.689,66.594 7.997,66.286 R122.2@7.997,65.585 8.428,65.585 8.752,65.261 U13.B1@8.752,64.674
  SIGNAL-1 w0.254: v1(6.668,66.594) 10.231,66.594 14.905,71.267 36.184,71.267 37.243,70.208 v1(37.243,66.859)
  SIGNAL-2 w0.254: v1(37.243,66.859) 38.933,65.169 38.933,55.646 35.954,52.667 28.623,52.667 27.655,51.699 27.655,39.924 29.128,38.451 66.118,38.451 67.727,40.06 67.727,42.852 v1(66.376,44.203)
  Bottom Layer w0.254: v1(66.376,44.203) 68.637,44.203 69.985,45.551 73.552,45.551 75.702,43.401 U7.39@79.999,43.401
RING: D21.4 J12.1 R82.2 | length 14.5
  Top Layer w0.635: v1(18.694,74.844) 18.694,84.199 J12.1@19.415,84.92
  Bottom Layer w0.508: R82.2@18.694,73.162 v1(18.694,74.844) ; D21.4@18.785,70.805 R82.2@18.785,73.259
RS232_RX: F22.1 J13.2 | length 8.9
  Bottom Layer w0.381: F22.1@73.785,76.647 73.785,83.41 J13.2@75.295,84.92
RS232_TX: F19.1 J13.3 | length 8.9
  Bottom Layer w0.381: J13.3@70.215,84.92 71.702,83.432 F19.1@71.702,76.652
RS485_N: F20.2 J10.1 | length 11.5
  Bottom Layer w0.152: F20.2@86.485,76.647 86.27,76.647 85.846,77.071 85.846,80.639 88.292,83.085 88.292,84.247 88.895,84.85 90.465,84.85 J10.1@90.535,84.92
RS485_P: F21.2 J10.2 | length 11.6
  Bottom Layer w0.152: F21.2@84.402,76.647 84.703,76.647 85.126,77.071 85.126,80.817 87.657,83.348 87.657,84.247 87.094,84.81 85.565,84.81 J10.2@85.455,84.92
RST_GSM: C86.2 D16.1 Q6.3 U16.83 | length 6.5
  Bottom Layer w0.305: U16.83@113.164,65.181 114.225,65.181 114.721,65.676 Q6.3@114.721,70.383
RST_GSM_2: C87.2 D22.1 Q7.3 U17.83 | length 7.4
  Top Layer w0.305: U17.83@103.608,76.312 v1(103.608,77.895)
  Bottom Layer w0.305: Q7.3@97.866,77.825 97.891,77.8 C87.2@99.085,77.8 99.65,77.8 D22.1@99.746,77.895 v1(103.608,77.895)
RSTB: R59.2 U7.95 U9.18 | length 77.5
  SIGNAL-2 w0.305: v1(26.64,56.125) 26.64,59.814 27.242,60.416 33.624,60.416 34.515,61.307 34.515,67.953 35.295,68.732 61.736,68.732 64.825,65.644 64.825,53.986 63.839,52.999 63.839,49.699 64.787,48.751 v1(66.399,48.751)
  Bottom Layer w0.203: R59.2@27.755,57.365 27.765,57.375 27.765,57.685 28.765,58.686 U9.18@28.765,59.483
  Bottom Layer w0.254: v1(26.64,56.125) 27.063,56.548 27.063,57.112 27.315,57.365 R59.2@27.755,57.365 ; U7.95@64.499,47.401 65.859,47.401 66.399,47.942 v1(66.399,48.751)
RX_ER: U7.81 U12.22 | length 36.7
  SIGNAL-1 w0.254: v1(66.376,40.697) 66.376,18.714 v1(67.234,17.856)
  Bottom Layer w0.254: U7.81@64.499,40.401 66.055,40.401 66.35,40.697 v1(66.376,40.697) ; v1(67.234,17.856) 67.234,20.193 68.395,21.355 U12.22@75.925,21.355
RXD/RS485/RS232: R79.1 U7.68 | length 71.2
  SIGNAL-1 w0.254: v1(65.618,32.227) 64.104,33.741 64.104,39.512 67.295,42.703 67.295,58.459 69.874,61.037 77.795,61.037 83.123,55.709 v1(87.417,55.709)
  Bottom Layer w0.203: v1(65.618,32.227) 65.618,31.358 66.924,30.052 69.644,30.052 70.399,30.807 70.399,34.143 69.749,34.793 U7.68@69.749,36.151
  Bottom Layer w0.305: v1(87.417,55.709) 88.627,55.709 89.365,56.446 R79.1@89.365,61.729
RXD/RS485/RS232/T: R68.1 R79.2 U8.1 U30.9 | length 17.8
  Bottom Layer w0.305: U30.9@76.009,70.391 79.032,70.391 83.278,66.144 86.19,66.144 87.476,64.858 U8.1@87.476,63.562
  Bottom Layer w0.381: U8.1@87.476,63.562 U8.1@87.476,63.348 R68.1@87.476,61.729 R79.2@88.425,61.729
SCL: J18.11 U7.92 | length 40.2
  SIGNAL-1 w0.254: v1(41.783,47.879) 42.724,46.938 42.724,40.691 43.339,40.076 46.57,40.076 47.193,40.699 47.193,45.491 47.911,46.21 v1(61.581,46.21)
  Bottom Layer w0.254: J18.11@36.91,47.293 38.26,47.293 41.197,47.293 v1(41.783,47.879) ; v1(61.581,46.21) 62.111,46.21 62.419,45.901 U7.92@64.499,45.901
SCLK: J11.3 U7.47 U9.40 | length 155.7
  SIGNAL-2 w0.203: v1(97.773,29.973) 101.183,29.973 102.179,28.976 102.179,9.029 103.375,7.833 103.375,6.51 J11.3@102.1,5.235
  SIGNAL-2 w0.254: v1(33.726,66.314) 32.862,66.314 31.135,68.041 26.443,68.041 25.42,67.019 25.42,38.16 26.595,36.985 69.951,36.985 74.566,41.6 75.399,41.6 v1(75.408,41.591)
  Bottom Layer w0.203: U9.40@32.265,65.383 32.265,66.145 32.434,66.314 v1(33.726,66.314)
  Bottom Layer w0.254: v1(75.408,41.591) 77.598,39.401 U7.47@79.999,39.401 80.955,39.401 81.605,38.751 81.605,35.019 82.745,33.879 82.745,29.28 83.328,28.697 96.497,28.697 v1(97.773,29.973)
SDA: J18.12 U7.93 | length 42.7
  SIGNAL-1 w0.254: v1(41.783,46.285) 42.248,45.82 42.248,40.096 42.899,39.446 46.927,39.446 47.836,40.355 47.836,44.946 48.318,45.428 62.074,45.428 62.459,45.813 62.459,46.903 62.111,47.251 v1(61.581,47.251)
  Bottom Layer w0.254: J18.12@36.91,46.793 41.275,46.793 v1(41.783,46.285) v1@41.689,46.285 ; v1(61.581,47.251) 62.111,47.251 62.961,46.401 U7.93@64.499,46.401
SDC_N: C67.2 R61.1 U9.14 | length 41.3
  Top Layer w0.203: R61.1@59.96,60.311 61.082,61.432 61.62,61.432 61.968,61.085 61.968,59.707 v1(61.717,59.456)
  SIGNAL-2 w0.203: v1(40.635,56.383) 40.812,56.206 42.299,56.206 43.726,57.633 61.425,57.633 61.968,58.176 61.968,59.269 61.78,59.456 v1(61.717,59.456)
  Bottom Layer w0.203: U9.14@30.765,59.483 30.765,58.388 31.08,58.073 C67.2@31.08,57.447 30.839,57.206 30.839,56.397 31.111,56.125 40.362,56.125 40.62,56.383 v1(40.635,56.383)
SDC_P: C67.1 R57.1 U9.15 | length 42.9
  Top Layer w0.203: R57.1@59.96,62.851 61.048,61.763 61.757,61.763 62.298,61.222 62.298,59.713 v1(62.555,59.456)
  SIGNAL-2 w0.203: v1(40.635,55.571) 40.642,55.571 40.947,55.875 42.436,55.875 43.863,57.302 61.561,57.302 62.298,58.039 62.298,59.269 62.485,59.456 v1(62.555,59.456)
  Bottom Layer w0.203: C67.1@30.115,57.536 30.265,57.686 U9.15@30.265,59.483 ; C67.1@30.141,57.447 30.509,57.079 30.509,56.26 30.974,55.795 40.411,55.795 v1(40.635,55.571)
SIM1_VDD_1: C84.2 J15.C1 U14.5 U16.18 | length 44.6
  Top Layer w0.305: v1(106.409,42.181) 107.464,43.236 v1(107.464,53.191)
  SIGNAL-2 w0.305: v1(91.508,63.731) 101.041,54.198 106.457,54.198 v1(107.464,53.191)
  Bottom Layer w0.203: C84.2@102.419,41.839 102.419,41.888 102.419,43.265 102.603,43.449 U14.5@103.208,43.449 104.058,43.449 104.299,43.207 104.299,42.573 104.552,42.32 105.166,42.32 J15.C1@105.308,42.179
  Bottom Layer w0.305: v1(91.508,63.731) 93.688,63.731 94.109,63.309 94.109,61.251 94.58,60.781 U16.18@95.564,60.781 ; J15.C1@105.308,42.179 v1@106.406,42.179
SIM1_VDD_2: SB1.1 U17.18 | length 17.2
  Top Layer w0.254: SB1.1@86.241,64.625 SB1.1@86.279,64.587
  Top Layer w0.305: SB1.1@86.279,64.587 v1(88.565,64.587) ; v1(91.508,62.529) 91.508,61.861 93.023,60.346 98.575,60.346 99.208,59.713 U17.18@99.208,58.712
  SIGNAL-2 w0.305: v1(88.565,64.587) 88.565,63.225 89.26,62.529 v1(91.508,62.529)
SIM2_VDD_1: SB3.1 U16.56 | length 43
  Top Layer w0.305: SB3.1@86.241,63.228 88.127,63.228 88.641,62.714 v1(88.641,60.561)
  SIGNAL-1 w0.305: v1(88.641,60.561) 86.837,62.364 86.837,73.579 88.401,75.142 96.669,75.142 v1(96.708,75.103)
  Bottom Layer w0.305: v1(96.708,75.103) 97.425,74.385 97.425,67.296 97.048,66.919 97.048,62.67 97.227,62.492 98.054,62.492 U16.56@98.064,62.481
SIM_CD_B1: R58.1 R126.2 U16.14 | length 31.2
  SIGNAL-1 w0.254: v1(94.254,55.976) 95.246,56.968 102.911,56.968 104.609,55.27 104.609,41.16 v1(103.208,39.759)
  Bottom Layer w0.203: v1(94.254,55.976) 94.659,56.381 U16.14@95.564,56.381 ; R58.1@102.419,41.082 R126.2@103.208,41.082 v1(103.208,39.759)
SIM_CD_B1#: J15.CD R126.1 U14.6 | length 5.5
  Bottom Layer w0.203: R126.1@103.208,41.632 U14.6@103.208,42.799 103.408,42.799 104.148,42.059 104.148,40.208 104.397,39.959 J15.CD@105.308,39.959
SIM_CD_B2: R65.1 R130.2 SB2.2 SB9.2 | length 61.9
  Top Layer w0.254: v1(83.548,59.491) SB2.2@84.717,59.491
  SIGNAL-1 w0.254: v1(88.77,52.063) 88.752,52.063 88.249,51.56 88.249,31.403 90.523,29.129 96.08,29.129 97.062,28.146 97.062,24.89 97.573,24.379 101.696,24.379 102.146,24.828 102.146,26.098 102.433,26.385 v1(103.195,26.385)
  Bottom Layer w0.203: R65.1@102.395,26.966 R130.2@103.208,26.966 103.195,26.953 v1(103.195,26.385)
  Bottom Layer w0.254: v1(83.548,59.491) 82.301,58.243 82.301,54.201 84.439,52.063 v1(88.77,52.063) 88.788,52.081 89.488,52.081 90.546,51.023 SB9.2@92.232,51.023
SIM_CD_B2#: J16.CD R130.1 U15.6 | length 5.3
  Bottom Layer w0.203: R130.1@103.208,27.516 U15.6@103.208,28.673 ; U15.6@103.408,28.673 104.148,27.933 104.148,26.082 104.397,25.833 J16.CD@105.308,25.833
SIM_CLK_B1: C112.1 R111.2 U16.16 | length 23.7
  SIGNAL-1 w0.254: v1(90.978,53.944) 98.064,46.858 v1(98.064,44.826)
  Bottom Layer w0.203: v1(90.978,53.944) 91.638,54.605 91.638,58.923 91.968,59.253 93.577,59.253 93.725,59.104 C112.1@93.725,58.585
  Bottom Layer w0.254: C112.1@93.725,58.585 93.729,58.581 U16.16@95.564,58.581 ; v1(98.064,44.826) 98.064,44.37 98.336,44.099 R111.2@99.255,44.099
SIM_CLK_B1#: J15.C3 R111.1 U14.3 | length 8.4
  Bottom Layer w0.203: R111.1@99.805,44.099 U14.3@101.268,44.099 102.053,44.099 102.238,44.284 102.238,46.931 102.566,47.259 J15.C3@105.308,47.259
SIM_CLK_B2: R128.2 SB8.2 SB15.2 | length 69.9
  Top Layer w0.254: v1(83.547,56.678) 84.715,56.678 SB8.2@84.717,56.68
  SIGNAL-1 w0.254: v1(83.547,56.678) 89.401,56.678 92.227,53.852 95.36,53.852 101.534,47.677 v1(101.534,32.366)
  Bottom Layer w0.254: v1(83.547,56.678) 83.547,54.399 84.403,53.542 88.372,53.542 90.468,55.639 90.468,70.889 91.359,71.78 SB15.2@92.779,71.78 ; R128.2@99.255,30.653 99.255,31.716 99.904,32.366 v1@101.268,32.366
SIM_CLK_B2#: J16.C3 R128.1 U15.3 | length 9
  Bottom Layer w0.203: R128.1@99.787,30.653 101.083,30.653 101.268,30.468 U15.3@101.268,29.973 102.053,29.973 102.238,30.158 102.238,32.805 102.566,33.133 J16.C3@105.308,33.133
SIM_DATA_B1: C110.1 R112.1 U16.15 | length 25
  SIGNAL-1 w0.254: v1(93.255,55.976) 94.068,55.164 95.07,55.164 96.239,56.332 102.67,56.332 103.997,55.005 103.997,47.405 v1(103.195,46.604)
  Bottom Layer w0.254: v1(93.255,55.976) 93.725,56.446 C110.1@93.725,57.231 94.545,57.231 94.796,57.481 U16.15@95.564,57.481 ; v1(103.195,46.604) 103.195,45.863 103.203,45.855 R112.1@103.208,45.855
SIM_DATA_B1#: J15.C7 R112.2 U14.4 | length 4.9
  Bottom Layer w0.203: R112.2@103.208,45.305 U14.4@103.208,44.099 104.025,44.099 104.249,44.323 104.249,45.771 104.469,45.99 105.306,45.99 J15.C7@105.308,45.989
SIM_DATA_B2: R129.1 SB4.2 SB11.2 | length 55
  Top Layer w0.254: v1(83.548,58.085) SB4.2@84.717,58.085
  SIGNAL-1 w0.254: v1(83.548,58.085) 84.308,57.326 89.651,57.326 92.448,54.529 94.254,54.529 ; 94.254,54.531 95.954,54.531 102.238,48.246 102.238,33.336 v1(103.208,32.366)
  Bottom Layer w0.254: v1(83.548,58.085) 82.851,57.388 82.851,54.425 84.337,52.939 91.068,52.939 91.56,53.431 SB11.2@92.201,53.431 ; R129.1@103.208,31.729 v1(103.208,32.366)
SIM_DATA_B2#: J16.C7 R129.2 U15.4 | length 4.9
  Bottom Layer w0.203: R129.2@103.21,31.178 103.21,29.971 104.026,29.971 104.251,30.195 104.251,31.643 104.47,31.863 J16.C7@105.308,31.863 J16.C7@105.308,31.863
SIM_RST_B1: C111.1 R106.2 U16.17 | length 31.2
  SIGNAL-1 w0.254: v1(89.962,53.944) 92.883,51.023 92.883,43.919 93.576,43.226 v1(98.064,43.226)
  Bottom Layer w0.203: v1(89.962,53.944) 90.952,54.935 90.952,60.723 91.407,61.178 93.289,61.178 93.721,60.746 93.721,60.041 93.774,59.988 C111.1@93.725,59.939 ; v1(98.064,43.226) 98.491,42.799 99.221,42.799 99.242,42.819 R106.2@99.258,42.819
  Bottom Layer w0.254: C111.1@93.787,59.931 94.607,59.931 94.857,59.681 U16.17@95.564,59.681 U16.17@95.626,59.681
SIM_RST_B1#: J15.C2 R106.1 U14.1 | length 12.4
  Top Layer w0.203: v1(100.93,41.956) 100.93,44.296 101.4,44.767 v1(106.409,44.767)
  Bottom Layer w0.203: v1(100.93,41.956) 100.044,41.956 99.805,42.194 R106.1@99.805,42.799 U14.1@101.268,42.799 ; J15.C2@105.308,44.719 105.356,44.767 v1(106.409,44.767)
SIM_RST_B2: R127.2 SB6.2 SB13.2 | length 70.1
  Top Layer w0.254: v1(84.717,54.29) SB6.2@84.717,55.275
  SIGNAL-1 w0.254: v1(84.717,54.29) 88.219,54.29 89.759,52.75 89.759,32.472 90.868,31.364 98.243,31.364 99.255,30.352 v1(99.255,27.713)
  Bottom Layer w0.254: v1(84.717,54.29) 88.303,54.29 89.999,55.986 89.999,71.28 91.57,72.852 96.079,72.852 96.416,72.515 SB13.2@96.416,71.78 ; v1@99.255,27.732 R127.2@99.255,28.673
SIM_RST_B2#: J16.C2 R127.1 U15.1 | length 11.8
  Top Layer w0.203: v1(100.93,27.713) 100.93,30.17 101.354,30.595 v1(106.409,30.595)
  Bottom Layer w0.203: R127.1@99.805,28.673 U15.1@101.268,28.673 101.268,28.052 v1(100.93,27.713) ; J16.C2@105.308,30.593 v1@106.406,30.593
SIM_VCC: C85.2 J16.C1 SB1.2 SB3.2 U15.5 | length 72.2
  Top Layer w0.508: v1(83.586,64.803) SB1.2@84.717,64.803
  SIGNAL-1 w0.305: v1(83.586,64.803) 83.586,61.133 85.943,58.776 92.795,58.776 95.126,61.107 107.284,61.107 108.605,59.786 108.605,28.671 107.989,28.055 v1(106.409,28.055)
  Bottom Layer w0.203: C85.2@102.419,27.762 102.419,29.139 102.603,29.323 U15.5@103.208,29.323 104.058,29.323 104.299,29.081 104.299,28.447 104.552,28.194 105.166,28.194 J16.C1@105.308,28.053 v1@106.406,28.053
SLIC-RING: C50.1 C61.1 R47.2 R67.2 U9.35 | length 14.6
  Top Layer w0.203: v1(22.914,63.437) 26.365,63.437 v1(29.426,66.498)
  Bottom Layer w0.203: U9.35@29.765,65.383 29.765,66.158 v1(29.426,66.498) 29.43,66.502 29.43,66.963 29.974,67.507 C50.1@30.062,67.507
  Bottom Layer w0.381: R47.2@23.025,65.405 R67.2@21.915,65.405 21.915,64.395 22.873,63.437 C61.1@23.673,63.437
SLIC-TIP: C48.1 C60.1 R53.2 R66.2 U9.36 | length 16.2
  Top Layer w0.203: v1(22.914,62.437) 26.545,62.437 v1(30.605,66.498)
  Bottom Layer w0.203: U9.36@30.265,65.383 30.265,66.158 v1(30.605,66.498) 31.062,66.955 C48.1@31.062,67.507
  Bottom Layer w0.381: R53.2@23.025,60.376 R66.2@21.915,60.376 21.915,61.45 22.903,62.437 C60.1@23.673,62.437
SPI1_CLK: U5.6 U7.30 | length 40.3
  Bottom Layer w0.203: U5.6@57.938,53.892 57.938,56.832 58.408,57.302 63.33,57.302 66.158,60.131 69.752,60.131 70.604,59.278 80.106,59.278 81.786,57.598 81.786,48.564 81.124,47.901 U7.30@79.999,47.901
SPI1_CS: U5.1 U7.29 | length 43.3
  SIGNAL-2 w0.254: v1(63.038,47.493) 63.767,46.763 69.214,46.763 70.226,47.775 70.226,56.373 72.979,59.126 76.22,59.126 v1(76.754,58.593)
  Bottom Layer w0.254: U5.1@60.478,46.682 60.478,47.735 60.746,48.004 62.527,48.004 v1(63.038,47.493) ; v1(76.754,58.593) 79.777,58.593 81.34,57.029 81.34,48.77 80.972,48.401 U7.29@79.999,48.401
SPI1_MISO: U5.2 U7.31 | length 31.2
  SIGNAL-2 w0.254: v1(59.208,48.105) 59.208,46.21 59.901,45.517 63.995,45.517 64.742,46.263 69.172,46.263 69.733,45.702 69.733,43.538 70.118,43.152 72.917,43.152 73.684,43.919 73.684,46.817 v1(74.88,48.013)
  Bottom Layer w0.203: U5.2@59.208,46.682 v1(59.208,48.105) ; v1(74.88,48.013) 78.483,48.013 79.095,47.401 U7.31@79.999,47.401
SPI1_MOSI: U5.5 U7.91 | length 18.1
  Bottom Layer w0.203: U5.5@56.668,53.892 56.668,53.377 55.902,52.61 55.902,45.164 56.315,44.751 62.495,44.751 63.145,45.401 U7.91@64.499,45.401
SPI_MISO: J11.1 U7.53 U9.39 | length 162.7
  SIGNAL-2 w0.203: v1(33.726,67.229) 33.142,67.229 32.825,67.545 32.825,68.749 32.491,69.083 26.542,69.083 24.836,67.377 24.836,37.862 26.253,36.444 70.205,36.444 74.269,40.508 v1(75.399,40.508) ; v1(97.773,28.862) 96.697,27.787 96.697,7.891 98.357,6.231 98.357,1.999 98.777,1.579 101.68,1.579 102.1,1.999 J11.1@102.1,3.235
  Bottom Layer w0.203: U9.39@31.765,65.383 31.765,66.316 32.678,67.229 v1(33.726,67.229) ; v1(75.399,40.508) 77.249,38.658 U7.53@77.249,36.151 77.249,35.275 77.777,34.747 79.528,34.747 80.42,33.855 80.42,28.784 81.004,28.2 97.111,28.2 v1(97.773,28.862)
SPI_MOSI: J11.4 U7.54 U9.38 | length 155.3
  SIGNAL-2 w0.203: v1(33.726,68.143) 33.726,69.228 33.252,69.701 26.293,69.701 24.245,67.654 24.245,37.615 25.938,35.922 70.771,35.922 v1(74.696,39.847) ; v1(97.773,27.713) 97.773,27.626 97.183,27.036 97.183,8.152 J11.4@100.1,5.235
  Bottom Layer w0.203: U9.38@31.265,65.383 31.265,66.498 32.911,68.143 v1(33.726,68.143) ; v1(74.696,39.847) 76.749,37.795 U7.54@76.749,36.151 76.749,35.095 77.536,34.308 79.238,34.308 79.871,33.675 79.871,28.562 80.719,27.713 v1(97.773,27.713)
SRINGC: R33.2 R82.1 | length 7.7
  Bottom Layer w0.508: R82.1@21.234,73.162 21.285,73.111 21.285,67.526 21.901,66.911 R33.2@23.025,66.911
STATUS: R93.1 U16.42 | length 8.7
  Top Layer w0.305: R93.1@108.756,53.48 109.494,53.48 109.793,53.779 109.793,54.998 110.212,55.418 v1(114.523,55.418)
  Bottom Layer w0.305: U16.42@113.164,55.281 113.301,55.418 v1(114.523,55.418)
STATUS_2: R92.1 U17.42 | length 14.7
  Top Layer w0.305: R92.1@83.084,75.812 83.084,77.877 83.994,78.787 92.205,78.787 93.708,77.284 U17.42@93.708,76.312
STIPC: R31.2 R62.2 | length 16.7
  Top Layer w0.508: v1(12.435,74.93) 12.435,73.709 13.335,72.809 20.291,72.809 v1@23.007,70.092
  Bottom Layer w0.508: R62.2@12.435,73.248 v1(12.435,74.93) ; R31.2@23.025,68.327 v1(23.025,70.074)
SVBAT: R30.1 U9.19 | length 3.3
  Top Layer w0.635: v1(27.427,58.516) 27.757,58.847 R30.1@28.899,58.847
  Bottom Layer w0.254: v1(27.427,58.516) 27.986,58.516 28.265,58.796 U9.19@28.265,59.483
SWCLK: J17.3 U7.76 | length 37.4
  Bottom Layer w0.203: J17.3@48.039,51.471 46.883,52.627 46.883,54.554 47.569,55.24 53.563,55.24 54.546,54.258 54.546,39.331 55.976,37.901 U7.76@64.499,37.901
SWDIO: J17.2 U7.72 | length 35.3
  Bottom Layer w0.203: J17.2@48.039,53.971 49.272,52.738 53.334,52.738 54.065,52.008 54.065,38.723 55.556,37.231 67.457,37.231 67.749,36.939 U7.72@67.749,36.151
TD_N: T1.3 U12.10 | length 7.5
  Bottom Layer w0.203: U12.10@78.875,20.355 80.911,20.355 81.829,19.436 81.829,18.483 82.266,18.046 82.97,18.046 84.011,19.087 T1.3@84.466,19.087